# Altium PCB 24V-70A-Power-Board-v2.0.PcbDoc (part 5 of 9)
Units mm, origin at the board's own origin, x right, y up, seen from the top; angles counter-clockwise.
Board outline 350 x 215 mm, 2 copper layers (Top Layer, Bottom Layer), stack 1.64 mm thick; 337 components, 182 nets, 856 pads, 561 vias.
Unrouted connection lines stored in the file: 58.
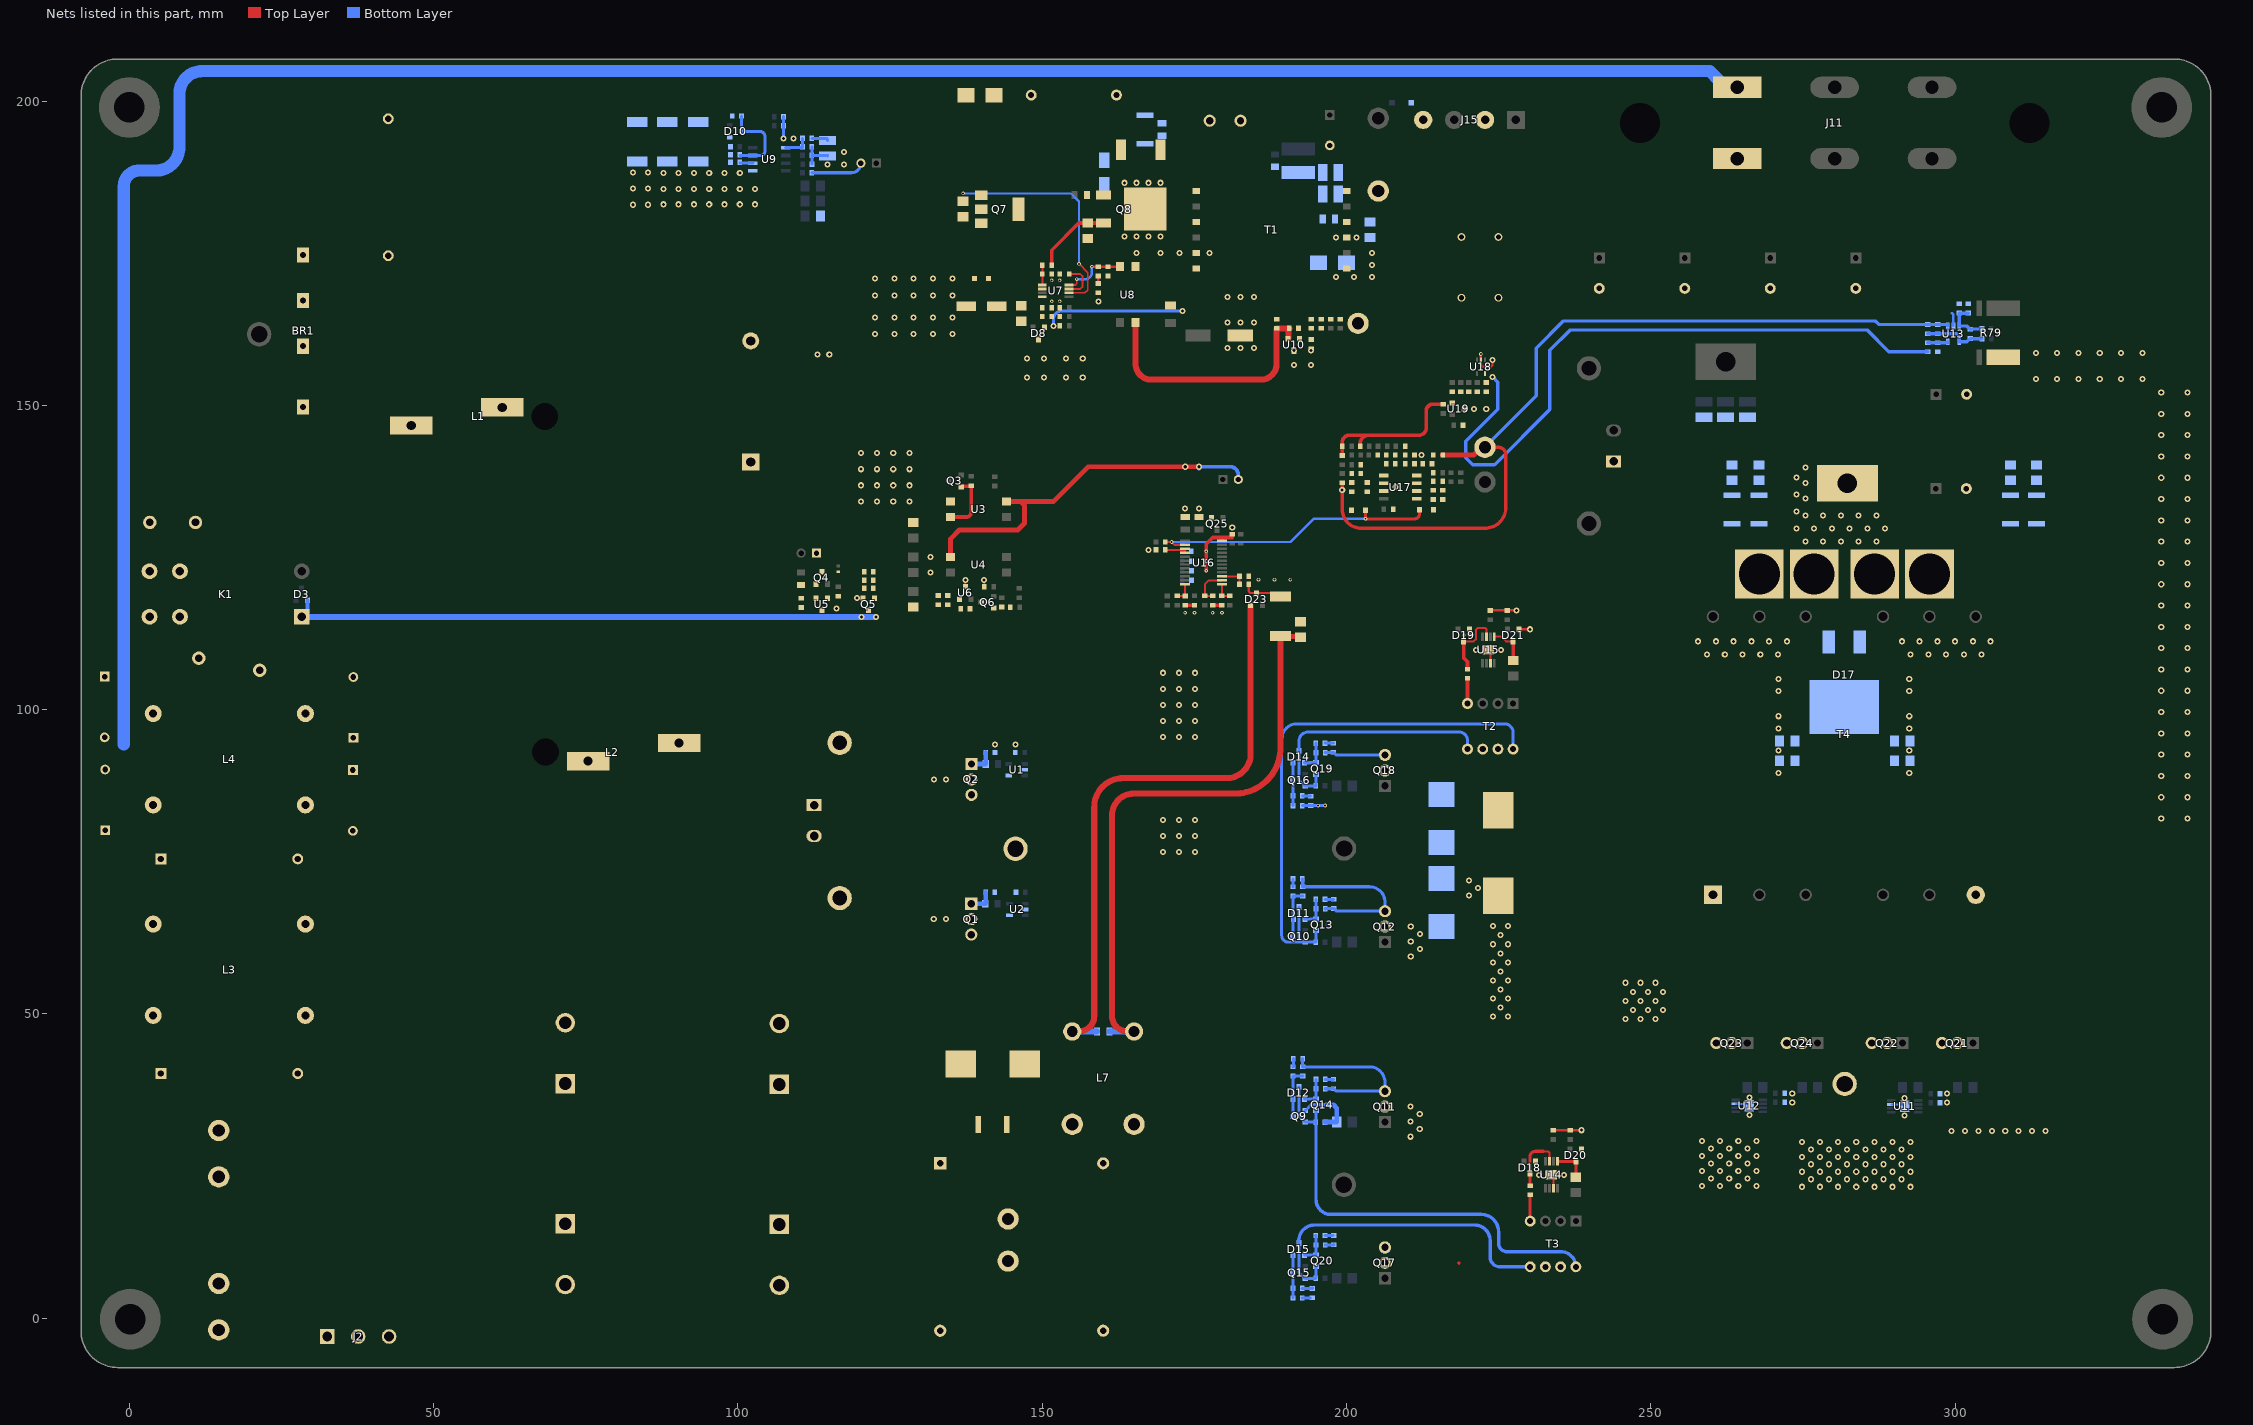
[diagram p2: the nets of this part, all layers, seen from the top]

## Part data (continued)
R37 R45: library part CRCW060316K2FKEA, "RES SMD 16.2K OHM 1% 1/10W 0603", LCSC Part Number=C844531, Manufacturer=Vishay, Voltage Rating (DC)=75V, ComponentLink1Description=https://datasheet.ciiva.com/11810/0900766b80d98afc-11810432.pdf?src-supplier=Rs, ComponentLink1URL=https://datasheet.ciiva.com/11810/0900766b80d98afc-11810432.pdf?src-supplier=Rs, ComponentLink2Description=https://datasheet.ciiva.com/2513/dcrcwe3-2513620.pdf?src-supplier=Digikey, ComponentLink2URL=https://datasheet.ciiva.com/2513/dcrcwe3-2513620.pdf?src-supplier=Digikey, ComponentLink3Description=https://datasheet.ciiva.com/2513/dcrcwe3-2513621.pdf?src-supplier=Digikey, ComponentLink3URL=https://datasheet.ciiva.com/2513/dcrcwe3-2513621.pdf?src-supplier=Digikey, ComponentLink4Description=https://datasheet.ciiva.com/2513/dcrcwe3-2513622.pdf?src-supplier=Digikey, ComponentLink4URL=https://datasheet.ciiva.com/2513/dcrcwe3-2513622.pdf?src-supplier=Digikey, ComponentLink5Description=https://datasheet.ciiva.com/3257/dcrcwe3-3257083.pdf?src-supplier=Avnet, ComponentLink5URL=https://datasheet.ciiva.com/3257/dcrcwe3-3257083.pdf?src-supplier=Avnet, ComponentLink6Description=https://datasheet.ciiva.com/16204/dcrcwe3-16204298.pdf?src-supplier=Future+Electronics, ComponentLink6URL=https://datasheet.ciiva.com/16204/dcrcwe3-16204298.pdf?src-supplier=Future+Electronics, ComponentLink7Description=https://datasheet.ciiva.com/7663/1697337-7663893.pdf?src-supplier=Element14, ComponentLink7URL=https://datasheet.ciiva.com/7663/1697337-7663893.pdf?src-supplier=Element14, ComponentLink8Description=https://datasheet.ciiva.com/7173/1635184-7173002.pdf?src-supplier=Newark, ComponentLink8URL=https://datasheet.ciiva.com/7173/1635184-7173002.pdf?src-supplier=Newark, ComponentLink9Description=https://datasheet.ciiva.com/22702/1697337-22702885.pdf?src-supplier=Element14, ComponentLink9URL=https://datasheet.ciiva.com/22702/1697337-22702885.pdf?src-supplier=Element14, ComponentLink10Description=https://datasheet.ciiva.com/16787/70201119-16787821.pdf?src-supplier=Allied+Electronics, ComponentLink10URL=https://datasheet.ciiva.com/16787/70201119-16787821.pdf?src-supplier=Allied+Electronics, ComponentLink11Description=https://datasheet.ciiva.com/22869/70201119-22869438.pdf?src-supplier=Allied+Electronics, ComponentLink11URL=https://datasheet.ciiva.com/22869/70201119-22869438.pdf?src-supplier=Allied+Electronics, ComponentLink12Description=https://datasheet.ciiva.com/5548/dcrcwe3-109170-5548517.pdf?src-supplier=Mouser, ComponentLink12URL=https://datasheet.ciiva.com/5548/dcrcwe3-109170-5548517.pdf?src-supplier=Mouser, ComponentLink13Description=https://datasheet.ciiva.com/7792/125364-7792056.pdf?src-supplier=Element14, ComponentLink13URL=https://datasheet.ciiva.com/7792/125364-7792056.pdf?src-supplier=Element14, Item Type=Resistors, Lead Free=5697LeadFree, Manufacturer Part Number=CRCW060316K2FKEA, Pricing="1=0.1, 10=0.016, 50=0.016, 100=0.01, 1000=0.008, 5000=0.005, 10000=0.004, 50000=0.003 (USD)", RoHS=Yes, Stock=14717, Supplier=Mouser
R39: library part 0603WAF1302T5E, "100mW Thick Film Resistors ±100ppm/℃ ±1% 13kΩ 0603 Chip Resistor - Surface Mount ROHS", LCSC Part Number=C22797, Manufacturer=UNI-ROYAL, Package=0603, ComponentLink1Description=LCSC, ComponentLink1URL=https://www.lcsc.com/product-detail/Chip-Resistor-Surface-Mount_UNI-ROYAL-Uniroyal-Elec-0603WAF1302T5E_C22797.html, Item Type=Resistor, Manufacturer Part Number=0603WAF1302T5E
R40: library part CRCW060386K6FKEA, "RES SMD 86.6K OHM 1% 1/10W 0603", Case Code (Imperial)=0603, Case Code (Metric)=1608, LCSC Part Number=C2076678, Manufacturer=Vishay, Max Operating Temperature=155°C, Max Power Dissipation=100mW, Min Operating Temperature=-55°C, Package Quantity=5000, Ratings=AEC-Q200, Resistance Tolerance=1%, Resistor Type="Thick Film", Temperature Coefficient=100ppm/°C, Voltage Rating=75V, Case/Package=0603, ComponentLink1Description=https://datasheet.ciiva.com/11812/0900766b80d98afc-11812181.pdf?src-supplier=Rs, ComponentLink1URL=https://datasheet.ciiva.com/11812/0900766b80d98afc-11812181.pdf?src-supplier=Rs, ComponentLink2Description=https://datasheet.ciiva.com/2466/dcrcwe3-2466293.pdf?src-supplier=Digikey, ComponentLink2URL=https://datasheet.ciiva.com/2466/dcrcwe3-2466293.pdf?src-supplier=Digikey, ComponentLink3Description=https://datasheet.ciiva.com/16779/70201119-16779662.pdf?src-supplier=Allied+Electronics, ComponentLink3URL=https://datasheet.ciiva.com/16779/70201119-16779662.pdf?src-supplier=Allied+Electronics, ComponentLink4Description=https://datasheet.ciiva.com/22869/70201119-22869020.pdf?src-supplier=Allied+Electronics, ComponentLink4URL=https://datasheet.ciiva.com/22869/70201119-22869020.pdf?src-supplier=Allied+Electronics, ComponentLink5Description=https://datasheet.ciiva.com/5549/dcrcwe3-109170-5549565.pdf?src-supplier=Mouser, ComponentLink5URL=https://datasheet.ciiva.com/5549/dcrcwe3-109170-5549565.pdf?src-supplier=Mouser, ComponentLink6Description=https://datasheet.ciiva.com/2466/dcrcwe3-2466294.pdf?src-supplier=Digikey, ComponentLink6URL=https://datasheet.ciiva.com/2466/dcrcwe3-2466294.pdf?src-supplier=Digikey, ComponentLink7Description=https://datasheet.ciiva.com/2466/dcrcwe3-2466295.pdf?src-supplier=Digikey, ComponentLink7URL=https://datasheet.ciiva.com/2466/dcrcwe3-2466295.pdf?src-supplier=Digikey, ComponentLink8Description=https://datasheet.ciiva.com/3257/dcrcwe3-3257941.pdf?src-supplier=Avnet, ComponentLink8URL=https://datasheet.ciiva.com/3257/dcrcwe3-3257941.pdf?src-supplier=Avnet, ComponentLink9Description=https://datasheet.ciiva.com/8337/dcrcwe3-8337688.pdf?src-supplier=Avnet, ComponentLink9URL=https://datasheet.ciiva.com/8337/dcrcwe3-8337688.pdf?src-supplier=Avnet, ComponentLink10Description=https://datasheet.ciiva.com/16435/dcrcw-16435963.pdf?src-supplier=Future+Electronics, ComponentLink10URL=https://datasheet.ciiva.com/16435/dcrcw-16435963.pdf?src-supplier=Future+Electronics, Construction=Rectangular, Contact Plating=Tin, Depth=0.85mm, Features="Automotive AEC-Q200", Height=0.45mm, Item Type=Resistors, Lead Free=5697LeadFree, Length=1.55mm, Manufacturer Part Number=CRCW060386K6FKEA, Military Standard=Not, Number of Terminations=2, Packaging="Tape and Reel", Pins=2, Power Rating=100mW, Pricing="1=0.1, 10=0.017, 50=0.017, 100=0.01, 1000=0.008, 10000=0.004 (USD)", Radiation Hardening=No, Reach SVHC Compliant=Unknown, RoHS=Yes, RoHS Compliant=Yes, Series=CRCW, Stock=21228, Supplier=Mouser, Technology="THICK FILM", Termination=SMD/SMT, Tolerance=1%, Voltage Rating (DC)=75V, Weight=7.1E-05oz, Width=0.85mm
R42: library part CRCW06037K50FKEA, "RES SMD 7.5K OHM 1% 1/10W 0603", Case Code (Imperial)=0603, Case Code (Metric)=1608, LCSC Part Number=C844808, Manufacturer=Vishay, Max Operating Temperature=155°C, Max Power Dissipation=100mW, Min Operating Temperature=-55°C, Package Quantity=5000, Ratings=AEC-Q200, Resistance Tolerance=1%, Resistor Type="Thick Film", Temperature Coefficient=100ppm/°C, Voltage Rating=75V, Case/Package=0603, ComponentLink1Description=https://datasheet.ciiva.com/11810/0900766b80d98afc-11810928.pdf?src-supplier=Rs, ComponentLink1URL=https://datasheet.ciiva.com/11810/0900766b80d98afc-11810928.pdf?src-supplier=Rs, ComponentLink2Description=https://datasheet.ciiva.com/26314/fld-crcw-e3-data-en-26314746.pdf?src-supplier=Distrelec, ComponentLink2URL=https://datasheet.ciiva.com/26314/fld-crcw-e3-data-en-26314746.pdf?src-supplier=Distrelec, ComponentLink3Description=https://datasheet.ciiva.com/7679/1697337-7679146.pdf?src-supplier=Element14, ComponentLink3URL=https://datasheet.ciiva.com/7679/1697337-7679146.pdf?src-supplier=Element14, ComponentLink4Description=https://datasheet.ciiva.com/2465/dcrcwe3-2465715.pdf?src-supplier=Digikey, ComponentLink4URL=https://datasheet.ciiva.com/2465/dcrcwe3-2465715.pdf?src-supplier=Digikey, ComponentLink5Description=https://datasheet.ciiva.com/2465/dcrcwe3-2465716.pdf?src-supplier=Digikey, ComponentLink5URL=https://datasheet.ciiva.com/2465/dcrcwe3-2465716.pdf?src-supplier=Digikey, ComponentLink6Description=https://datasheet.ciiva.com/2465/dcrcwe3-2465714.pdf?src-supplier=Digikey, ComponentLink6URL=https://datasheet.ciiva.com/2465/dcrcwe3-2465714.pdf?src-supplier=Digikey, ComponentLink7Description=https://datasheet.ciiva.com/16774/70201119-16774541.pdf?src-supplier=Allied+Electronics, ComponentLink7URL=https://datasheet.ciiva.com/16774/70201119-16774541.pdf?src-supplier=Allied+Electronics, ComponentLink8Description=https://datasheet.ciiva.com/5544/dcrcwe3-109170-5544283.pdf?src-supplier=Mouser, ComponentLink8URL=https://datasheet.ciiva.com/5544/dcrcwe3-109170-5544283.pdf?src-supplier=Mouser, ComponentLink9Description=https://datasheet.ciiva.com/3257/dcrcwe3-3257903.pdf?src-supplier=Avnet, ComponentLink9URL=https://datasheet.ciiva.com/3257/dcrcwe3-3257903.pdf?src-supplier=Avnet, ComponentLink10Description=https://datasheet.ciiva.com/16389/dcrcw-16389894.pdf?src-supplier=Future+Electronics, ComponentLink10URL=https://datasheet.ciiva.com/16389/dcrcw-16389894.pdf?src-supplier=Future+Electronics, ComponentLink11Description=https://datasheet.ciiva.com/3257/dcrcwe3-3257902.pdf?src-supplier=Avnet, ComponentLink11URL=https://datasheet.ciiva.com/3257/dcrcwe3-3257902.pdf?src-supplier=Avnet, Construction=Rectangular, Contact Plating=Tin, Depth=0.85mm, Features="Automotive AEC-Q200", Height=0.45mm, Item Type=Resistor, Lead Free=5697LeadFree, Length=1.55mm, Manufacturer Part Number=CRCW06037K50FKEA, Military Standard=Not, Number of Terminations=2, Packaging="Tape and Reel", Power Rating=100mW, Pricing="1=0.1, 10=0.017, 50=0.017, 100=0.01, 1000=0.008, 10000=0.004 (USD)", Radiation Hardening=No, Reach SVHC Compliant=Unknown, RoHS=Yes, RoHS Compliant=Yes, Series=CRCW, Stock=12180, Supplier=Mouser, Technology="THICK FILM", Termination=SMD/SMT, Tolerance=1%, Voltage Rating (DC)=75V, Weight=7.1E-05oz, Width=0.85mm
R43: library part RT0603BRD077K5L, "RES SMD 7.5K OHM 0.1% 1/10W 0603", Case Code (Imperial)=0603, Case Code (Metric)=1608, LCSC Part Number=C728597, Manufacturer=Yageo, Max Operating Temperature=125°C, Max Power Dissipation=100mW, Min Operating Temperature=-55°C, Package Quantity=5000, Resistance=7.5kR, Resistor Type="Thin Film", Temperature Coefficient=25ppm/°C, Tolerance=0.1%, Voltage Rating=75V, Voltage Rating (DC)=50V, Case/Package=0603, Category="Chip SMD Resistors", ComponentLink1Description=https://datasheet.ciiva.com/8891/pyu-rt-1-to-0-05-rohs-l-4-8891914.pdf?src-supplier=Avnet, ComponentLink1URL=https://datasheet.ciiva.com/8891/pyu-rt-1-to-0-05-rohs-l-4-8891914.pdf?src-supplier=Avnet, Contact Plating=Tin,Matte, Features="Moisture Resistant", Height=0.022inch, Item Type=Resistor, Lead Free="Lead Free", Length=0.063inch, Manufacturer Part Number=RT0603BRD077K5L, Number of Terminations=2, Packaging="Tape and Reel", Power Rating=100mW, Pricing 1="5000=0.02327, 10000=0.02294, 20000=0.02227 (USD)", Radiation Hardening=No, RoHS=Yes, RoHS Compliant=Yes, Series=RT, Size Code=0603, Stock 1=30000, Supplier 1=Avnet, Supplier Part Number 1=RT0603BRD077K5L, Termination=SMD/SMT, Weight=7.1E-05oz, Width=0.8mm
R44: library part RT0603BRD076K34L, "RES SMD 6.34KOHM 0.1% 1/10W 0603", Case Code (Imperial)=0603, Case Code (Metric)=1608, LCSC Part Number=C861532, Manufacturer=Yageo, Max Operating Temperature=125°C, Min Operating Temperature=-55°C, Power Rating=100mW, Resistance=6.34kR, Supplier Part Number 1=YAG4590CT-ND, Temperature Coefficient=25ppm/°C, Tolerance=0.1%, Voltage Rating=75V, Voltage Rating (DC)=50V, Case/Package=0603, Category="Chip SMD Resistors", ComponentLink1Description=https://datasheet.ciiva.com/12811/pyu-rt-1-to-0-05-rohs-l-4-12811741.pdf?src-supplier=Mouser, ComponentLink1URL=https://datasheet.ciiva.com/12811/pyu-rt-1-to-0-05-rohs-l-4-12811741.pdf?src-supplier=Mouser, Height=0.45mm, Item Type=Resistor, Lead Free="Lead Free", Length=1.6mm, Manufacturer Part Number=RT0603BRD076K34L, Packaging="Tape and Reel", Pricing 1="1=0.34000, 10=0.28800, 100=0.11260, 500=0.06812, 1000=0.04716, 2500=0.04322 (USD)", RoHS=Yes, RoHS Compliant=Yes, Series=RT, Stock 1=15385, Supplier 1=Digi-Key, Termination=SMD/SMT, Weight=7.1E-05oz, Width=0.8mm
R46: library part CRCW12061R00FKEA, "RES SMD 1 OHM 1% 1/4W 1206", LCSC Part Number=C844870, Manufacturer=Vishay, Voltage Rating (DC)=200V, ComponentLink1Description=https://datasheet.ciiva.com/11811/0900766b80d98b5e-11811443.pdf?src-supplier=Rs, ComponentLink1URL=https://datasheet.ciiva.com/11811/0900766b80d98b5e-11811443.pdf?src-supplier=Rs, ComponentLink2Description=https://datasheet.ciiva.com/5548/dcrcwe3-109170-5548686.pdf?src-supplier=Mouser, ComponentLink2URL=https://datasheet.ciiva.com/5548/dcrcwe3-109170-5548686.pdf?src-supplier=Mouser, ComponentLink3Description=https://datasheet.ciiva.com/16724/70201119-16724205.pdf?src-supplier=Allied+Electronics, ComponentLink3URL=https://datasheet.ciiva.com/16724/70201119-16724205.pdf?src-supplier=Allied+Electronics, ComponentLink4Description=https://datasheet.ciiva.com/7841/1720486-7841869.pdf?src-supplier=Element14, ComponentLink4URL=https://datasheet.ciiva.com/7841/1720486-7841869.pdf?src-supplier=Element14, ComponentLink5Description=https://datasheet.ciiva.com/16295/dcrcwe3-16295679.pdf?src-supplier=Future+Electronics, ComponentLink5URL=https://datasheet.ciiva.com/16295/dcrcwe3-16295679.pdf?src-supplier=Future+Electronics, ComponentLink6Description=https://datasheet.ciiva.com/2468/dcrcwe3-2468799.pdf?src-supplier=Digikey, ComponentLink6URL=https://datasheet.ciiva.com/2468/dcrcwe3-2468799.pdf?src-supplier=Digikey, ComponentLink7Description=https://datasheet.ciiva.com/2468/dcrcwe3-2468800.pdf?src-supplier=Digikey, ComponentLink7URL=https://datasheet.ciiva.com/2468/dcrcwe3-2468800.pdf?src-supplier=Digikey, ComponentLink8Description=https://datasheet.ciiva.com/2468/dcrcwe3-2468801.pdf?src-supplier=Digikey, ComponentLink8URL=https://datasheet.ciiva.com/2468/dcrcwe3-2468801.pdf?src-supplier=Digikey, ComponentLink9Description=https://datasheet.ciiva.com/9109/dcrcwe3-9109199.pdf?src-supplier=Avnet, ComponentLink9URL=https://datasheet.ciiva.com/9109/dcrcwe3-9109199.pdf?src-supplier=Avnet, Item Type=Resistor, Lead Free=5697LeadFree, Manufacturer Part Number=CRCW12061R00FKEA, Pricing="1=0.12, 10=0.037, 50=0.037, 100=0.024, 1000=0.021, 10000=0.013 (USD)", RoHS=Yes, Stock=28572, Supplier=Mouser
R48: library part RC0805FR-07100KL, "RES 100K OHM 1% 1/8W 0805", Case Code (Imperial)=0805, Case Code (Metric)=2012, LCSC Part Number=C96346, Manufacturer=Yageo, Max Operating Temperature=155°C, Max Power Dissipation=125mW, Min Operating Temperature=-55°C, Package Quantity=1, Resistance=100kR, Resistance Tolerance=1%, Resistor Type="Thick Film", Temperature Coefficient=100ppm/°C, Voltage Rating=150V, Case/Package=0805, Category="Chip SMD Resistors", ComponentLink1Description=https://datasheet.ciiva.com/11808/0900766b8106beab-11808858.pdf?src-supplier=RSComponents, ComponentLink1URL=https://datasheet.ciiva.com/11808/0900766b8106beab-11808858.pdf?src-supplier=RSComponents, ComponentLink2Description=https://datasheet.ciiva.com/7941/1686128-7941677.pdf?src-supplier=Element14, ComponentLink2URL=https://datasheet.ciiva.com/7941/1686128-7941677.pdf?src-supplier=Element14, ComponentLink3Description=https://datasheet.ciiva.com/7660/38627-7660796.pdf?src-supplier=Element14, ComponentLink3URL=https://datasheet.ciiva.com/7660/38627-7660796.pdf?src-supplier=Element14, ComponentLink4Description=https://datasheet.ciiva.com/22747/444164-22747534.pdf?src-supplier=Element14, ComponentLink4URL=https://datasheet.ciiva.com/22747/444164-22747534.pdf?src-supplier=Element14, ComponentLink5Description=https://datasheet.ciiva.com/2457/pyu-r-int-thick-7-2457018.pdf?src-supplier=Digi-Key, ComponentLink5URL=https://datasheet.ciiva.com/2457/pyu-r-int-thick-7-2457018.pdf?src-supplier=Digi-Key, ComponentLink6Description=https://datasheet.ciiva.com/2457/pyu-r-int-thick-7-2457019.pdf?src-supplier=Digi-Key, ComponentLink6URL=https://datasheet.ciiva.com/2457/pyu-r-int-thick-7-2457019.pdf?src-supplier=Digi-Key, ComponentLink7Description=https://datasheet.ciiva.com/2457/pyu-r-int-thick-7-2457017.pdf?src-supplier=Digi-Key, ComponentLink7URL=https://datasheet.ciiva.com/2457/pyu-r-int-thick-7-2457017.pdf?src-supplier=Digi-Key, ComponentLink8Description=https://datasheet.ciiva.com/12667/rc0805-12667001.pdf?src-supplier=Mouser, ComponentLink8URL=https://datasheet.ciiva.com/12667/rc0805-12667001.pdf?src-supplier=Mouser, ComponentLink9Description=https://datasheet.ciiva.com/7941/1697719-7941676.pdf?src-supplier=Element14, ComponentLink9URL=https://datasheet.ciiva.com/7941/1697719-7941676.pdf?src-supplier=Element14, ComponentLink10Description=https://datasheet.ciiva.com/7941/1697719-7941678.pdf?src-supplier=Element14, ComponentLink10URL=https://datasheet.ciiva.com/7941/1697719-7941678.pdf?src-supplier=Element14, ComponentLink11Description=https://datasheet.ciiva.com/16747/rc0805-16747226.pdf?src-supplier=Future+Electronics, ComponentLink11URL=https://datasheet.ciiva.com/16747/rc0805-16747226.pdf?src-supplier=Future+Electronics, Construction=Rectangular, Depth=1.25mm, Features="Moisture Resistant", Height=0.024inch, Item Type=Resistor, Lead Free="Lead Free", Lead Pitch=0.4mm, Length=0.079inch, Manufacturer Part Number=RC0805FR-07100KL, Military Standard=Not, Number of Pins=2, Number of Terminations=2, Packaging="Tape and Reel", Power Rating=125mW, Pricing 1="5000=0.00227, 10000=0.00224, 20000=0.00217 (USD)", RoHS=Yes, RoHS Compliant=Yes, Series=RC, Size Code=0805, Stock 1=695000, Supplier 1=Avnet, Supplier Part Number 1=RC0805FR-07100KL, Technology="THICK FILM", Termination=SMD/SMT, Tolerance=1%, Voltage Rating (DC)=150V, Width=0.049inch
R49 R69 R70 R71 R72: library part RC2010FK-0710RL, "RES 10 OHM 1% 3/4W 2010", LCSC Part Number=C137067, Manufacturer=Yageo, ComponentLink1Description=https://datasheet.ciiva.com/12667/pyu-rc2010-51-rohs-l-4-12667047.pdf?src-supplier=Mouser, ComponentLink1URL=https://datasheet.ciiva.com/12667/pyu-rc2010-51-rohs-l-4-12667047.pdf?src-supplier=Mouser, ComponentLink2Description=https://datasheet.ciiva.com/7672/1563630-7672315.pdf?src-supplier=Element14, ComponentLink2URL=https://datasheet.ciiva.com/7672/1563630-7672315.pdf?src-supplier=Element14, ComponentLink3Description=https://datasheet.ciiva.com/7672/1563630-7672316.pdf?src-supplier=Element14, ComponentLink3URL=https://datasheet.ciiva.com/7672/1563630-7672316.pdf?src-supplier=Element14, ComponentLink4Description=https://datasheet.ciiva.com/17422/pyu-rc2010-51-rohs-l-4-17422060.pdf?src-supplier=Future+Electronics, ComponentLink4URL=https://datasheet.ciiva.com/17422/pyu-rc2010-51-rohs-l-4-17422060.pdf?src-supplier=Future+Electronics, Item Type=Resistors, Manufacturer Part Number=RC2010FK-0710RL, Pricing="4000=0.041, 12000=0.0395, 20000=0.0388, 60000=0.0374, 100000=0.0362 (USD)", RoHS=Yes, Stock=8000, Supplier="Future Electronics"
R50 R51 R52 R55 R57 R58 R60 R61 R62 R65 R66 R67 R81: library part CRCW0603100RFKEA, "RES SMD 100 OHM 1% 1/10W 0603", Case Code (Imperial)=0603, Case Code (Metric)=1608, LCSC Part Number=C844917, Manufacturer="Vishay Dale", Max Operating Temperature=155°C, Max Power Dissipation=100mW, Min Operating Temperature=-55°C, Package Quantity=10, Ratings=AEC-Q200, Resistance Tolerance=1%, Resistor Type="Thick Film", Temperature Coefficient=100ppm/°C, Voltage Rating=75V, Case/Package=0603, ComponentLink1Description=https://datasheet.ciiva.com/22666/1720486-22666207.pdf?src-supplier=Element14, ComponentLink1URL=https://datasheet.ciiva.com/22666/1720486-22666207.pdf?src-supplier=Element14, ComponentLink2Description=https://datasheet.ciiva.com/26316/fld-crcw-e3-data-en-26316566.pdf?src-supplier=Distrelec, ComponentLink2URL=https://datasheet.ciiva.com/26316/fld-crcw-e3-data-en-26316566.pdf?src-supplier=Distrelec, ComponentLink3Description=https://datasheet.ciiva.com/22673/1697337-22673066.pdf?src-supplier=Element14, ComponentLink3URL=https://datasheet.ciiva.com/22673/1697337-22673066.pdf?src-supplier=Element14, ComponentLink4Description=https://datasheet.ciiva.com/2465/dcrcwe3-2465544.pdf?src-supplier=Digikey, ComponentLink4URL=https://datasheet.ciiva.com/2465/dcrcwe3-2465544.pdf?src-supplier=Digikey, ComponentLink5Description=https://datasheet.ciiva.com/2465/dcrcwe3-2465545.pdf?src-supplier=Digikey, ComponentLink5URL=https://datasheet.ciiva.com/2465/dcrcwe3-2465545.pdf?src-supplier=Digikey, ComponentLink6Description=https://datasheet.ciiva.com/2465/dcrcwe3-2465543.pdf?src-supplier=Digikey, ComponentLink6URL=https://datasheet.ciiva.com/2465/dcrcwe3-2465543.pdf?src-supplier=Digikey, ComponentLink7Description=https://datasheet.ciiva.com/16721/70201119-16721486.pdf?src-supplier=Allied+Electronics, ComponentLink7URL=https://datasheet.ciiva.com/16721/70201119-16721486.pdf?src-supplier=Allied+Electronics, ComponentLink8Description=https://datasheet.ciiva.com/16787/70201119-16787964.pdf?src-supplier=Allied+Electronics, ComponentLink8URL=https://datasheet.ciiva.com/16787/70201119-16787964.pdf?src-supplier=Allied+Electronics, ComponentLink9Description=https://datasheet.ciiva.com/5550/dcrcwe3-109170-5550286.pdf?src-supplier=Mouser, ComponentLink9URL=https://datasheet.ciiva.com/5550/dcrcwe3-109170-5550286.pdf?src-supplier=Mouser, ComponentLink10Description=https://datasheet.ciiva.com/16199/dcrcwe3-16199102.pdf?src-supplier=Future+Electronics, ComponentLink10URL=https://datasheet.ciiva.com/16199/dcrcwe3-16199102.pdf?src-supplier=Future+Electronics, Construction=Rectangular, Depth=0.85mm, Features="Automotive AEC-Q200", Height=0.02inch, Item Type=Resistors, Lead Free=5697LeadFree, Length=1.55mm, Manufacturer Part Number=CRCW0603100RFKEA, Military Standard=Not, Number of Terminations=2, Packaging="Tape and Reel", Pins=2NUMBER, Power Rating=100mW, Pricing="1=0.1, 10=0.017, 50=0.017, 100=0.01, 1000=0.008, 10000=0.004 (USD)", Reach SVHC Compliant=Unknown, RoHS=Yes, RoHS Compliant=Yes, Series=CRCW, Stock=584918, Supplier=Mouser, Termination=SMD/SMT, Tolerance=1%, Voltage Rating (DC)=75V, Weight=7.1E-05oz, Width=0.033inch
R53 R54 R63 R64: library part RC1206FR-0710RL, "RES 10 OHM 1% 1/4W 1206", LCSC Part Number=C108080, Manufacturer=Yageo, Voltage Rating (AC)=200V, ComponentLink1Description=https://datasheet.ciiva.com/11819/0900766b80c6630a-11819896.pdf?src-supplier=Rs, ComponentLink1URL=https://datasheet.ciiva.com/11819/0900766b80c6630a-11819896.pdf?src-supplier=Rs, ComponentLink2Description=https://datasheet.ciiva.com/22735/444357-22735648.pdf?src-supplier=Farnell, ComponentLink2URL=https://datasheet.ciiva.com/22735/444357-22735648.pdf?src-supplier=Farnell, ComponentLink3Description=https://datasheet.ciiva.com/29181/402303-da-01-en-smd-widerstand-chip1206-10-ohm-29181572.pdf?src-supplier=Conrad, ComponentLink3URL=https://datasheet.ciiva.com/29181/402303-da-01-en-smd-widerstand-chip1206-10-ohm-29181572.pdf?src-supplier=Conrad, ComponentLink4Description=https://datasheet.ciiva.com/2460/pyu-rc1206-51-rohs-l-4-2460048.pdf?src-supplier=Digikey, ComponentLink4URL=https://datasheet.ciiva.com/2460/pyu-rc1206-51-rohs-l-4-2460048.pdf?src-supplier=Digikey, ComponentLink5Description=https://datasheet.ciiva.com/2460/pyu-rc1206-51-rohs-l-4-2460049.pdf?src-supplier=Digikey, ComponentLink5URL=https://datasheet.ciiva.com/2460/pyu-rc1206-51-rohs-l-4-2460049.pdf?src-supplier=Digikey, ComponentLink6Description=https://datasheet.ciiva.com/2460/pyu-rc1206-51-rohs-l-4-2460050.pdf?src-supplier=Digikey, ComponentLink6URL=https://datasheet.ciiva.com/2460/pyu-rc1206-51-rohs-l-4-2460050.pdf?src-supplier=Digikey, ComponentLink7Description=https://datasheet.ciiva.com/46445/444357-46445704.pdf?src-supplier=Element14, ComponentLink7URL=https://datasheet.ciiva.com/46445/444357-46445704.pdf?src-supplier=Element14, ComponentLink8Description=https://datasheet.ciiva.com/16962/pyu-rc1206-51-rohs-l-4-16962857.pdf?src-supplier=Future+Electronics, ComponentLink8URL=https://datasheet.ciiva.com/16962/pyu-rc1206-51-rohs-l-4-16962857.pdf?src-supplier=Future+Electronics, Item Type=Resistor, Lead Free=5697LeadFree, Manufacturer Part Number=RC1206FR-0710RL, Pricing="1=0.125, 25=0.043, 50=0.034, 100=0.026 (USD)", RoHS=Yes, Stock=3696, Supplier=Avnet
R56 R59 R73 R74 R75 R76: library part FRC1206F2R21TS, "250mW Thick Film Resistors 200V ±200ppm/℃ ±1% 2.21Ω 1206 Chip Resistor - Surface Mount ROHS", LCSC Part Number=C5126181, Manufacturer=FOJAN, Package=1206, ComponentLink1Description=LCSC, ComponentLink1URL=https://www.lcsc.com/product-detail/Chip-Resistor-Surface-Mount_FOJAN-FRC1206F2R21TS_C5126181.html, Item Type=Resistor, Manufacturer Part Number=FRC1206F2R21TS
R68: library part RTO020F10000JTE3, "RES 1K OHM 20W 5% TO220", Manufacturer="Vishay Sfernice", Supplier Part Number=RT20J-1.0K-ND, Voltage Rating (AC)=250V, ComponentLink1Description=https://datasheet.ciiva.com/7983/425987-7983241.pdf?src-supplier=Element14, ComponentLink1URL=https://datasheet.ciiva.com/7983/425987-7983241.pdf?src-supplier=Element14, ComponentLink2Description=https://datasheet.ciiva.com/8881/rto20-8881142.pdf?src-supplier=Avnet, ComponentLink2URL=https://datasheet.ciiva.com/8881/rto20-8881142.pdf?src-supplier=Avnet, ComponentLink3Description=https://datasheet.ciiva.com/2764/rto20-2764239.pdf?src-supplier=Digikey, ComponentLink3URL=https://datasheet.ciiva.com/2764/rto20-2764239.pdf?src-supplier=Digikey, Item Type=Resistors, Manufacturer Part Number=RTO020F10000JTE3, Pricing="1=13, 10=8.931, 50=7.3644, 100=6.8873, 500=6.09046, 1000=5.84687 (USD)", RoHS=Yes, Stock=50, Supplier=Digikey
R77 R82: library part RT0603BRD07165KL, "RES SMD 165K OHM 0.1% 1/10W 0603", Case Code (Imperial)=0603, Case Code (Metric)=1608, LCSC Part Number=C861150, Manufacturer=Yageo, Max Operating Temperature=155°C, Max Power Dissipation=100mW, Min Operating Temperature=-55°C, Package Quantity=5000, Resistor Type="Thin Film", Temperature Coefficient=25ppm/°C, Tolerance=0.1%, Voltage Rating=75V, Voltage Rating (DC)=50V, Case/Package=0603, Category="Chip SMD Resistors", ComponentLink1Description=https://datasheet.ciiva.com/12704/pyu-rt-1-to-0-05-rohs-l-4-12704968.pdf?src-supplier=Mouser, ComponentLink1URL=https://datasheet.ciiva.com/12704/pyu-rt-1-to-0-05-rohs-l-4-12704968.pdf?src-supplier=Mouser, ComponentLink2Description=https://datasheet.ciiva.com/46635/pyu-rt-1-to-0-05-rohs-l-5-46635005.pdf?src-supplier=Digi-Key, ComponentLink2URL=https://datasheet.ciiva.com/46635/pyu-rt-1-to-0-05-rohs-l-5-46635005.pdf?src-supplier=Digi-Key, ComponentLink3Description=https://datasheet.ciiva.com/2585/pyu-rt-1-to-0-05-rohs-l-4-2585694.pdf?src-supplier=Digi-Key, ComponentLink3URL=https://datasheet.ciiva.com/2585/pyu-rt-1-to-0-05-rohs-l-4-2585694.pdf?src-supplier=Digi-Key, Features="Moisture Resistant", Height=0.022inch, Item Type=Resistor, Lead Free="Lead Free", Length=0.063inch, Manufacturer Part Number=RT0603BRD07165KL, Number of Terminations=2, Packaging="Tape and Reel", Power Rating=100mW, Pricing 1="5000=0.02327, 10000=0.02294, 20000=0.02227 (USD)", RoHS=Yes, RoHS Compliant=Yes, Series=RT, Stock 1=5000, Supplier 1=Avnet, Supplier Part Number 1=RT0603BRD07165KL, Termination=SMD/SMT, Width=0.031inch
R78 R80 R101 R115: library part CRCW06031K00FKEA, "RES SMD 1K OHM 1% 1/10W 0603", Case Code (Imperial)=0603, Case Code (Metric)=1608, LCSC Part Number=C844920, Manufacturer="Vishay Dale", Max Operating Temperature=155°C, Max Power Dissipation=100mW, Min Operating Temperature=-55°C, Package Quantity=5000, Ratings=AEC-Q200, Resistance Tolerance=1%, Resistor Type="Thick Film", Supplier Part Number=71-CRCW0603-1.0K-E3, Temperature Coefficient=100ppm/°C, Voltage Rating=75V, Case/Package=0603, Category="Chip SMD Resistors", ComponentLink1Description=https://datasheet.ciiva.com/11808/0900766b80d98afc-11808625.pdf?src-supplier=Rs, ComponentLink1URL=https://datasheet.ciiva.com/11808/0900766b80d98afc-11808625.pdf?src-supplier=Rs, ComponentLink2Description=https://datasheet.ciiva.com/11808/0900766b80d98afc-11808625.pdf?src-supplier=Rs, ComponentLink2URL=https://datasheet.ciiva.com/11808/0900766b80d98afc-11808625.pdf?src-supplier=Rs, ComponentLink3Description=https://datasheet.ciiva.com/46441/1720486-46441623.pdf?src-supplier=Element14, ComponentLink3URL=https://datasheet.ciiva.com/46441/1720486-46441623.pdf?src-supplier=Element14, ComponentLink4Description=https://datasheet.ciiva.com/46441/1720486-46441622.pdf?src-supplier=Element14, ComponentLink4URL=https://datasheet.ciiva.com/46441/1720486-46441622.pdf?src-supplier=Element14, ComponentLink5Description=https://datasheet.ciiva.com/26316/fld-crcw-e3-data-en-26316551.pdf?src-supplier=Distrelec, ComponentLink5URL=https://datasheet.ciiva.com/26316/fld-crcw-e3-data-en-26316551.pdf?src-supplier=Distrelec, ComponentLink6Description=https://datasheet.ciiva.com/2465/dcrcwe3-2465536.pdf?src-supplier=Digi-Key, ComponentLink6URL=https://datasheet.ciiva.com/2465/dcrcwe3-2465536.pdf?src-supplier=Digi-Key, ComponentLink7Description=https://datasheet.ciiva.com/2465/dcrcwe3-2465534.pdf?src-supplier=Digi-Key, ComponentLink7URL=https://datasheet.ciiva.com/2465/dcrcwe3-2465534.pdf?src-supplier=Digi-Key, ComponentLink8Description=https://datasheet.ciiva.com/16199/dcrcwe3-16199053.pdf?src-supplier=Future+Electronics, ComponentLink8URL=https://datasheet.ciiva.com/16199/dcrcwe3-16199053.pdf?src-supplier=Future+Electronics, ComponentLink9Description=https://datasheet.ciiva.com/46385/1697337-46385497.pdf?src-supplier=Element14, ComponentLink9URL=https://datasheet.ciiva.com/46385/1697337-46385497.pdf?src-supplier=Element14, ComponentLink10Description=https://datasheet.ciiva.com/2465/dcrcwe3-2465535.pdf?src-supplier=Digi-Key, ComponentLink10URL=https://datasheet.ciiva.com/2465/dcrcwe3-2465535.pdf?src-supplier=Digi-Key, ComponentLink11Description=https://datasheet.ciiva.com/8336/dcrcwe3-8336822.pdf?src-supplier=Avnet, ComponentLink11URL=https://datasheet.ciiva.com/8336/dcrcwe3-8336822.pdf?src-supplier=Avnet, ComponentLink12Description=https://datasheet.ciiva.com/3257/dcrcwe3-3257132.pdf?src-supplier=Avnet, ComponentLink12URL=https://datasheet.ciiva.com/3257/dcrcwe3-3257132.pdf?src-supplier=Avnet, ComponentLink13Description=https://datasheet.ciiva.com/2465/dcrcwe3-2465535.pdf?src-supplier=Digikey, ComponentLink13URL=https://datasheet.ciiva.com/2465/dcrcwe3-2465535.pdf?src-supplier=Digikey, ComponentLink14Description=https://datasheet.ciiva.com/2465/dcrcwe3-2465536.pdf?src-supplier=Digikey, ComponentLink14URL=https://datasheet.ciiva.com/2465/dcrcwe3-2465536.pdf?src-supplier=Digikey, ComponentLink15Description=https://datasheet.ciiva.com/2465/dcrcwe3-2465534.pdf?src-supplier=Digikey, ComponentLink15URL=https://datasheet.ciiva.com/2465/dcrcwe3-2465534.pdf?src-supplier=Digikey, Construction=Rectangular, Contact Plating=Tin, Depth=0.85mm, Features="Automotive AEC-Q200", Height=0.45mm, Item Type=Resistor, Lead Free=5697LeadFree, Length=1.55mm, Manufacturer Part Number=CRCW06031K00FKEA, Military Standard=Not, Number of Terminations=2, Packaging="Tape and Reel", Pins=2, Power Rating=100mW, Pricing="1=0.1, 10=0.017, 50=0.017, 100=0.01, 1000=0.008, 10000=0.004 (USD)", Radiation Hardening=No, Reach SVHC Compliant=Unknown, RoHS=Yes, RoHS Compliant=Yes, Series=CRCW, Stock=1295653, Supplier=Mouser, Technology="THICK FILM", Termination=SMD/SMT, Tolerance=1%, Voltage Rating (DC)=75V, Weight=7.1E-05oz, Width=0.85mm
R79: library part BVR-Z-R0002-1.0, "RESISTOR - ISA-WELD SHUNT, 0.000", Manufacturer=Isabellenhütte, Supplier Part Number=4423-BVR-Z-R0002-1.0CT-ND, Item Type=RESISTOR, Manufacturer Part Number=BVR-Z-R0002-1.0, Pricing="1=5.08, 10=3.052, 25=2.5316, 50=2.2122, 100=1.9452, 250=1.65756, 500=1.5125 (USD)", RoHS=Yes, Stock=3918, Supplier=Digikey
R84: library part 0603WAF6812T5E, "100mW Thick Film Resistors 75V ±100ppm/℃ ±1% 68.1kΩ 0603 Chip Resistor - Surface Mount ROHS", LCSC Part Number=C25976, Manufacturer=Uniroyal, Item Type=Resistor, Manufacturer Part Number=0603WAF6812T5E, RoHS=No, Supplier=LCSC
R89: library part RC0603FR-0715K4L, "RES 15.4K OHM 1% 1/10W 0603", LCSC Part Number=C185370, Manufacturer=Yageo, Voltage Rating (DC)=50V, ComponentLink1Description=https://datasheet.ciiva.com/15159/getdatasheetpartid-28826-15159212.pdf?src-supplier=Verical, ComponentLink1URL=https://datasheet.ciiva.com/15159/getdatasheetpartid-28826-15159212.pdf?src-supplier=Verical, ComponentLink2Description=https://datasheet.ciiva.com/11808/0900766b80f96399-11808544.pdf?src-supplier=Rs, ComponentLink2URL=https://datasheet.ciiva.com/11808/0900766b80f96399-11808544.pdf?src-supplier=Rs, ComponentLink3Description=https://datasheet.ciiva.com/2454/pyu-r-int-thick-7-2454348.pdf?src-supplier=Digikey, ComponentLink3URL=https://datasheet.ciiva.com/2454/pyu-r-int-thick-7-2454348.pdf?src-supplier=Digikey, ComponentLink4Description=https://datasheet.ciiva.com/2454/pyu-r-int-thick-7-2454349.pdf?src-supplier=Digikey, ComponentLink4URL=https://datasheet.ciiva.com/2454/pyu-r-int-thick-7-2454349.pdf?src-supplier=Digikey, ComponentLink5Description=https://datasheet.ciiva.com/2454/pyu-r-int-thick-7-2454350.pdf?src-supplier=Digikey, ComponentLink5URL=https://datasheet.ciiva.com/2454/pyu-r-int-thick-7-2454350.pdf?src-supplier=Digikey, Item Type=Resistors, Lead Free=5697LeadFree, Manufacturer Part Number=RC0603FR-0715K4L, Pricing="5000=0.0022, 50000=0.0021, 150000=0.0021, 375000=0.002, 1000000=0.0019 (USD)", RoHS=Yes, RoHS Compliant=5897YesNo, Stock=230000, Supplier="Future Electronics"
R91: library part RC0603FR-072K49L, "RES 2.49K OHM 1% 1/10W 0603", Case Code (Imperial)=0603, Case Code (Metric)=1608, LCSC Part Number=C108190, Manufacturer=Yageo, Max Operating Temperature=155°C, Max Power Dissipation=100mW, Min Operating Temperature=-55°C, Resistance Tolerance=1%, Resistor Type="Thick Film", Supplier Part Number=4546610, Temperature Coefficient=100ppm/°C, Voltage Rating=50V, Case/Package=0603, Category="Chip SMD Resistors", ComponentLink1Description=https://datasheet.ciiva.com/46395/443971-46395001.pdf?src-supplier=Element14, ComponentLink1URL=https://datasheet.ciiva.com/46395/443971-46395001.pdf?src-supplier=Element14, Features="Moisture Resistant", Height=450um, Item Type=Resistor, Lead Free=5697LeadFree, Length=1.6mm, Manufacturer Part Number=RC0603FR-072K49L, Number of Terminations=2, Packaging="Tape and Reel", Pins=2NUMBER, Power Rating=100mW, Pricing="5000=0.0013, 50000=0.0013, 150000=0.0012, 375000=0.0012, 1000000=0.0011 (USD)", Reach SVHC Compliant=Unknown, RoHS=Yes, RoHS Compliant=Yes, Series=RC, Stock=2930000, Supplier="Future Electronics", Termination=SMD/SMT, Tolerance=1%, Voltage Rating (DC)=50V, Width=800um
R93 R94 R95: library part RC0603FR-0749K9L, "RES 49.9K OHM 1% 1/10W 0603", Case Code (Imperial)=0603, Case Code (Metric)=1608, LCSC Part Number=C114624, Manufacturer=Yageo, Max Operating Temperature=155°C, Max Power Dissipation=100mW, Min Operating Temperature=-55°C, Package Quantity=1, Resistance=49.9kR, Resistor Type="Thick Film", Supplier Part Number 1=311-49.9KHRCT-ND, Temperature Coefficient=100ppm/°C, Tolerance=1%, Voltage Rating=50V, Case/Package=0603, Category="Chip SMD Resistors", ComponentLink1Description=https://datasheet.ciiva.com/2454/pyu-r-int-thick-7-2454042.pdf?src-supplier=Digi-Key, ComponentLink1URL=https://datasheet.ciiva.com/2454/pyu-r-int-thick-7-2454042.pdf?src-supplier=Digi-Key, ComponentLink2Description=https://datasheet.ciiva.com/2454/pyu-r-int-thick-7-2454043.pdf?src-supplier=Digi-Key, ComponentLink2URL=https://datasheet.ciiva.com/2454/pyu-r-int-thick-7-2454043.pdf?src-supplier=Digi-Key, ComponentLink3Description=https://datasheet.ciiva.com/2454/pyu-r-int-thick-7-2454044.pdf?src-supplier=Digi-Key, ComponentLink3URL=https://datasheet.ciiva.com/2454/pyu-r-int-thick-7-2454044.pdf?src-supplier=Digi-Key, ComponentLink4Description=https://datasheet.ciiva.com/15189/getdatasheetpartid-323805-15189749.pdf?src-supplier=Verical, ComponentLink4URL=https://datasheet.ciiva.com/15189/getdatasheetpartid-323805-15189749.pdf?src-supplier=Verical, Construction=Rectangular, Depth=0.8mm, Features="Moisture Resistant", Height=0.022inch, Item Type=Resistor, Lead Free="Lead Free", Length=0.063inch, Manufacturer Part Number=RC0603FR-0749K9L, Military Standard=Not, Mount="Surface Mount", Number of Terminations=2, Packaging="Tape and Reel", Power Rating=100mW, Pricing 1="1=0.10000, 10=0.02400, 100=0.00970, 1000=0.00436, 2500=0.00378 (USD)", RoHS=Yes, RoHS Compliant=Yes, Series=RC, Size Code=0603, Stock 1=77863, Supplier 1=Digi-Key, Termination=SMD/SMT, Voltage Rating (DC)=50V, Width=0.031inch
R96: library part CRCW06032K37FKEA, "RES SMD 2.37K OHM 1% 1/10W 0603", LCSC Part Number=C2091101, Manufacturer=Vishay, Voltage Rating (DC)=75V, ComponentLink1Description=https://datasheet.ciiva.com/11812/0900766b80d98afc-11812338.pdf?src-supplier=Rs, ComponentLink1URL=https://datasheet.ciiva.com/11812/0900766b80d98afc-11812338.pdf?src-supplier=Rs, ComponentLink2Description=https://datasheet.ciiva.com/7792/125364-7792183.pdf?src-supplier=Element14, ComponentLink2URL=https://datasheet.ciiva.com/7792/125364-7792183.pdf?src-supplier=Element14, ComponentLink3Description=https://datasheet.ciiva.com/7670/1697337-7670233.pdf?src-supplier=Element14, ComponentLink3URL=https://datasheet.ciiva.com/7670/1697337-7670233.pdf?src-supplier=Element14, ComponentLink4Description=https://datasheet.ciiva.com/7670/1697337-7670234.pdf?src-supplier=Element14, ComponentLink4URL=https://datasheet.ciiva.com/7670/1697337-7670234.pdf?src-supplier=Element14, ComponentLink5Description=https://datasheet.ciiva.com/3257/dcrcwe3-3257383.pdf?src-supplier=Avnet, ComponentLink5URL=https://datasheet.ciiva.com/3257/dcrcwe3-3257383.pdf?src-supplier=Avnet, ComponentLink6Description=https://datasheet.ciiva.com/3257/dcrcwe3-3257384.pdf?src-supplier=Avnet, ComponentLink6URL=https://datasheet.ciiva.com/3257/dcrcwe3-3257384.pdf?src-supplier=Avnet, ComponentLink7Description=https://datasheet.ciiva.com/2466/dcrcwe3-2466221.pdf?src-supplier=Digikey, ComponentLink7URL=https://datasheet.ciiva.com/2466/dcrcwe3-2466221.pdf?src-supplier=Digikey, ComponentLink8Description=https://datasheet.ciiva.com/2466/dcrcwe3-2466222.pdf?src-supplier=Digikey, ComponentLink8URL=https://datasheet.ciiva.com/2466/dcrcwe3-2466222.pdf?src-supplier=Digikey, ComponentLink9Description=https://datasheet.ciiva.com/2466/dcrcwe3-2466223.pdf?src-supplier=Digikey, ComponentLink9URL=https://datasheet.ciiva.com/2466/dcrcwe3-2466223.pdf?src-supplier=Digikey, ComponentLink10Description=https://datasheet.ciiva.com/16761/70201119-16761733.pdf?src-supplier=Allied+Electronics, ComponentLink10URL=https://datasheet.ciiva.com/16761/70201119-16761733.pdf?src-supplier=Allied+Electronics, ComponentLink11Description=https://datasheet.ciiva.com/16215/dcrcwe3-16215145.pdf?src-supplier=Future+Electronics, ComponentLink11URL=https://datasheet.ciiva.com/16215/dcrcwe3-16215145.pdf?src-supplier=Future+Electronics, Item Type=Resistors, Lead Free=5697LeadFree, Manufacturer Part Number=CRCW06032K37FKEA, Pricing="1=0.1, 10=0.017, 50=0.017, 100=0.01, 1000=0.008, 10000=0.005 (USD)", RoHS=Yes, Stock=34700, Supplier=Mouser
R97: library part RT0603FRE0713KL, "RES SMD 13K OHM 1% 1/10W 0603", Case Code (Imperial)=0603, Case Code (Metric)=1608, LCSC Part Number=C863575, Manufacturer=Yageo, Max Operating Temperature=125°C, Max Power Dissipation=100mW, Min Operating Temperature=-55°C, Package Quantity=5000, Temperature Coefficient=50ppm/°C, Tolerance=1%, Voltage Rating=75V, Voltage Rating (DC)=50V, Case/Package=0603, ComponentLink1Description=https://datasheet.ciiva.com/2559/pyu-rt-1-to-0-05-rohs-l-5-2559527.pdf?src-supplier=Digikey, ComponentLink1URL=https://datasheet.ciiva.com/2559/pyu-rt-1-to-0-05-rohs-l-5-2559527.pdf?src-supplier=Digikey, Contact Plating=Tin,Lead, Height=0.022inch, Item Type=Resistors, Lead Free="Lead Free", Length=0.063inch, Manufacturer Part Number=RT0603FRE0713KL, Number of Terminations=2, Packaging="Tape and Reel", Power Rating=100mW, Pricing="5000=0.0057, 20000=0.0055, 100000=0.0052, 200000=0.0051, 625000=0.0049 (USD)", RoHS=Yes, RoHS Compliant=Yes, Series=RT, Stock=70000, Supplier="Future Electronics", Termination=SMD/SMT, Width=0.031inch
R98: library part CRCW06034K64FKEA, "RES SMD 4.64K OHM 1% 1/10W 0603", Case Code (Imperial)=0603, Case Code (Metric)=1608, LCSC Part Number=C844174, Manufacturer=Vishay, Max Operating Temperature=155°C, Max Power Dissipation=100mW, Min Operating Temperature=-55°C, Package Quantity=10, Ratings=AEC-Q200, Resistance Tolerance=1%, Resistor Type="Thick Film", Supplier Part Number=YAG4536CT-ND, Temperature Coefficient=100ppm/°C, Voltage Rating=75V, Case/Package=0603, Category="Chip SMD Resistors", ComponentLink1Description=https://datasheet.ciiva.com/11811/0900766b80d98afc-11811841.pdf?src-supplier=Rs, ComponentLink1URL=https://datasheet.ciiva.com/11811/0900766b80d98afc-11811841.pdf?src-supplier=Rs, ComponentLink2Description=https://datasheet.ciiva.com/16199/dcrcwe3-16199878.pdf?src-supplier=Future+Electronics, ComponentLink2URL=https://datasheet.ciiva.com/16199/dcrcwe3-16199878.pdf?src-supplier=Future+Electronics, ComponentLink3Description=https://datasheet.ciiva.com/22675/1912744-22675963.pdf?src-supplier=Element14, ComponentLink3URL=https://datasheet.ciiva.com/22675/1912744-22675963.pdf?src-supplier=Element14, ComponentLink4Description=https://datasheet.ciiva.com/2465/dcrcwe3-2465796.pdf?src-supplier=Digikey, ComponentLink4URL=https://datasheet.ciiva.com/2465/dcrcwe3-2465796.pdf?src-supplier=Digikey, ComponentLink5Description=https://datasheet.ciiva.com/3257/dcrcwe3-3257663.pdf?src-supplier=Avnet, ComponentLink5URL=https://datasheet.ciiva.com/3257/dcrcwe3-3257663.pdf?src-supplier=Avnet, ComponentLink6Description=https://datasheet.ciiva.com/2465/dcrcwe3-2465797.pdf?src-supplier=Digikey, ComponentLink6URL=https://datasheet.ciiva.com/2465/dcrcwe3-2465797.pdf?src-supplier=Digikey, ComponentLink7Description=https://datasheet.ciiva.com/2465/dcrcwe3-2465795.pdf?src-supplier=Digikey, ComponentLink7URL=https://datasheet.ciiva.com/2465/dcrcwe3-2465795.pdf?src-supplier=Digikey, ComponentLink8Description=https://datasheet.ciiva.com/16767/70201119-16767079.pdf?src-supplier=Allied+Electronics, ComponentLink8URL=https://datasheet.ciiva.com/16767/70201119-16767079.pdf?src-supplier=Allied+Electronics, ComponentLink9Description=https://datasheet.ciiva.com/22871/70201119-22871831.pdf?src-supplier=Allied+Electronics, ComponentLink9URL=https://datasheet.ciiva.com/22871/70201119-22871831.pdf?src-supplier=Allied+Electronics, ComponentLink10Description=https://datasheet.ciiva.com/5542/dcrcwe3-109170-5542042.pdf?src-supplier=Mouser, ComponentLink10URL=https://datasheet.ciiva.com/5542/dcrcwe3-109170-5542042.pdf?src-supplier=Mouser, ComponentLink11Description=https://datasheet.ciiva.com/2585/pyu-rt-1-to-0-05-rohs-l-5-2585895.pdf?src-supplier=Digikey, ComponentLink11URL=https://datasheet.ciiva.com/2585/pyu-rt-1-to-0-05-rohs-l-5-2585895.pdf?src-supplier=Digikey, Construction=Rectangular, Contact Plating=Tin, Depth=0.85mm, Features="Automotive AEC-Q200", Height=0.45mm, Item Type=Resistors, Lead Free=5697LeadFree, Length=1.55mm, Manufacturer Part Number=CRCW06034K64FKEA, Military Standard=Not, Number of Terminations=2, Packaging="Tape and Reel", Power Rating=100mW, Pricing="1=0.1, 10=0.017, 50=0.017, 100=0.01, 1000=0.008, 10000=0.005 (USD)", Radiation Hardening=No, Reach SVHC Compliant=Unknown, RoHS=Yes, RoHS Compliant=Yes, Series=CRCW, Stock=38921, Supplier=Mouser, Technology="THICK FILM", Termination=SMD/SMT, Tolerance=1%, Voltage Rating (DC)=75V, Weight=7.1E-05oz, Width=0.033inch, Working Voltage=75V
R99: library part RT0603BRD07348RL, "RES SMD 348 OHM 0.1% 1/10W 0603", Case Code (Imperial)=0603, Case Code (Metric)=1608, LCSC Part Number=C861337, Manufacturer=Yageo, Max Operating Temperature=155°C, Max Power Dissipation=100mW, Min Operating Temperature=-55°C, Package Quantity=5000, Temperature Coefficient=25ppm/°C, Tolerance=0.1%, Voltage Rating=75V, Voltage Rating (DC)=50V, Case/Package=0603, ComponentLink1Description=https://datasheet.ciiva.com/2585/pyu-rt-1-to-0-05-rohs-l-5-2585895.pdf?src-supplier=Digikey, ComponentLink1URL=https://datasheet.ciiva.com/2585/pyu-rt-1-to-0-05-rohs-l-5-2585895.pdf?src-supplier=Digikey, Height=0.022inch, Item Type=Resistors, Lead Free="Lead Free", Length=0.063inch, Manufacturer Part Number=RT0603BRD07348RL, Number of Terminations=2, Packaging="Tape and Reel", Power Rating=100mW, Pricing="1=0.14, 10=0.106, 50=0.0846, 100=0.0755, 500=0.05814, 1000=0.051 (USD)", RoHS=Yes, RoHS Compliant=Yes, Series=RT, Stock=5186, Supplier=Digikey, Termination=SMD/SMT, Width=0.031inch
R100: library part CRCW0603562RFKEA, "RES SMD 562 OHM 1% 1/10W 0603", LCSC Part Number=C3013827, Manufacturer=Vishay, Voltage Rating (DC)=75V, ComponentLink1Description=https://datasheet.ciiva.com/11810/0900766b80d98afc-11810929.pdf?src-supplier=Rs, ComponentLink1URL=https://datasheet.ciiva.com/11810/0900766b80d98afc-11810929.pdf?src-supplier=Rs, ComponentLink2Description=https://datasheet.ciiva.com/7882/1533075-7882061.pdf?src-supplier=Element14, ComponentLink2URL=https://datasheet.ciiva.com/7882/1533075-7882061.pdf?src-supplier=Element14, ComponentLink3Description=https://datasheet.ciiva.com/16391/dcrcw-16391085.pdf?src-supplier=Future+Electronics, ComponentLink3URL=https://datasheet.ciiva.com/16391/dcrcw-16391085.pdf?src-supplier=Future+Electronics, ComponentLink4Description=https://datasheet.ciiva.com/16778/70201119-16778669.pdf?src-supplier=Allied+Electronics, ComponentLink4URL=https://datasheet.ciiva.com/16778/70201119-16778669.pdf?src-supplier=Allied+Electronics, Item Type=Resistors, Lead Free=5697LeadFree, Manufacturer Part Number=CRCW0603562RFKEA, Pricing="1=0.1, 10=0.017, 50=0.017, 100=0.013, 1000=0.009, 10000=0.006 (USD)", RoHS=Yes, Stock=59904, Supplier=Mouser
R102: library part CRCW251216R2FKEG, "RES SMD 16.2 OHM 1% 1W 2512", Manufacturer="Vishay Dale", Supplier Part Number=71-CRCW251216R2FKEG, Voltage Rating (DC)=500V, ComponentLink1Description=https://datasheet.ciiva.com/16435/dcrcwe3-16435705.pdf?src-supplier=Future+Electronics, ComponentLink1URL=https://datasheet.ciiva.com/16435/dcrcwe3-16435705.pdf?src-supplier=Future+Electronics, ComponentLink2Description=https://datasheet.ciiva.com/5547/dcrcwe3-109170-5547624.pdf?src-supplier=Mouser, ComponentLink2URL=https://datasheet.ciiva.com/5547/dcrcwe3-109170-5547624.pdf?src-supplier=Mouser, ComponentLink3Description=https://datasheet.ciiva.com/9037/dcrcwe3-9037223.pdf?src-supplier=Avnet, ComponentLink3URL=https://datasheet.ciiva.com/9037/dcrcwe3-9037223.pdf?src-supplier=Avnet, ComponentLink4Description=https://datasheet.ciiva.com/7695/dcrcwe3-7695070.pdf?src-supplier=Element14, ComponentLink4URL=https://datasheet.ciiva.com/7695/dcrcwe3-7695070.pdf?src-supplier=Element14, Item Type=Resistor, Lead Free=5697LeadFree, Manufacturer Part Number=CRCW251216R2FKEG, Pins=2NUMBER, Pricing="1=0.28, 10=0.122, 50=0.122, 100=0.077, 1000=0.068, 10000=0.044 (USD)", RoHS=Yes, Stock=6301, Supplier=Mouser